# Altium PCB PCB1.PcbDoc
Units mm, origin at the board's own origin, x right, y up, seen from the top; angles counter-clockwise.
Board outline 70 x 100 mm, 2 copper layers (Top Layer, Bottom Layer), stack 1.601 mm thick; 10 components, 18 nets, 290 pads, 31 vias.
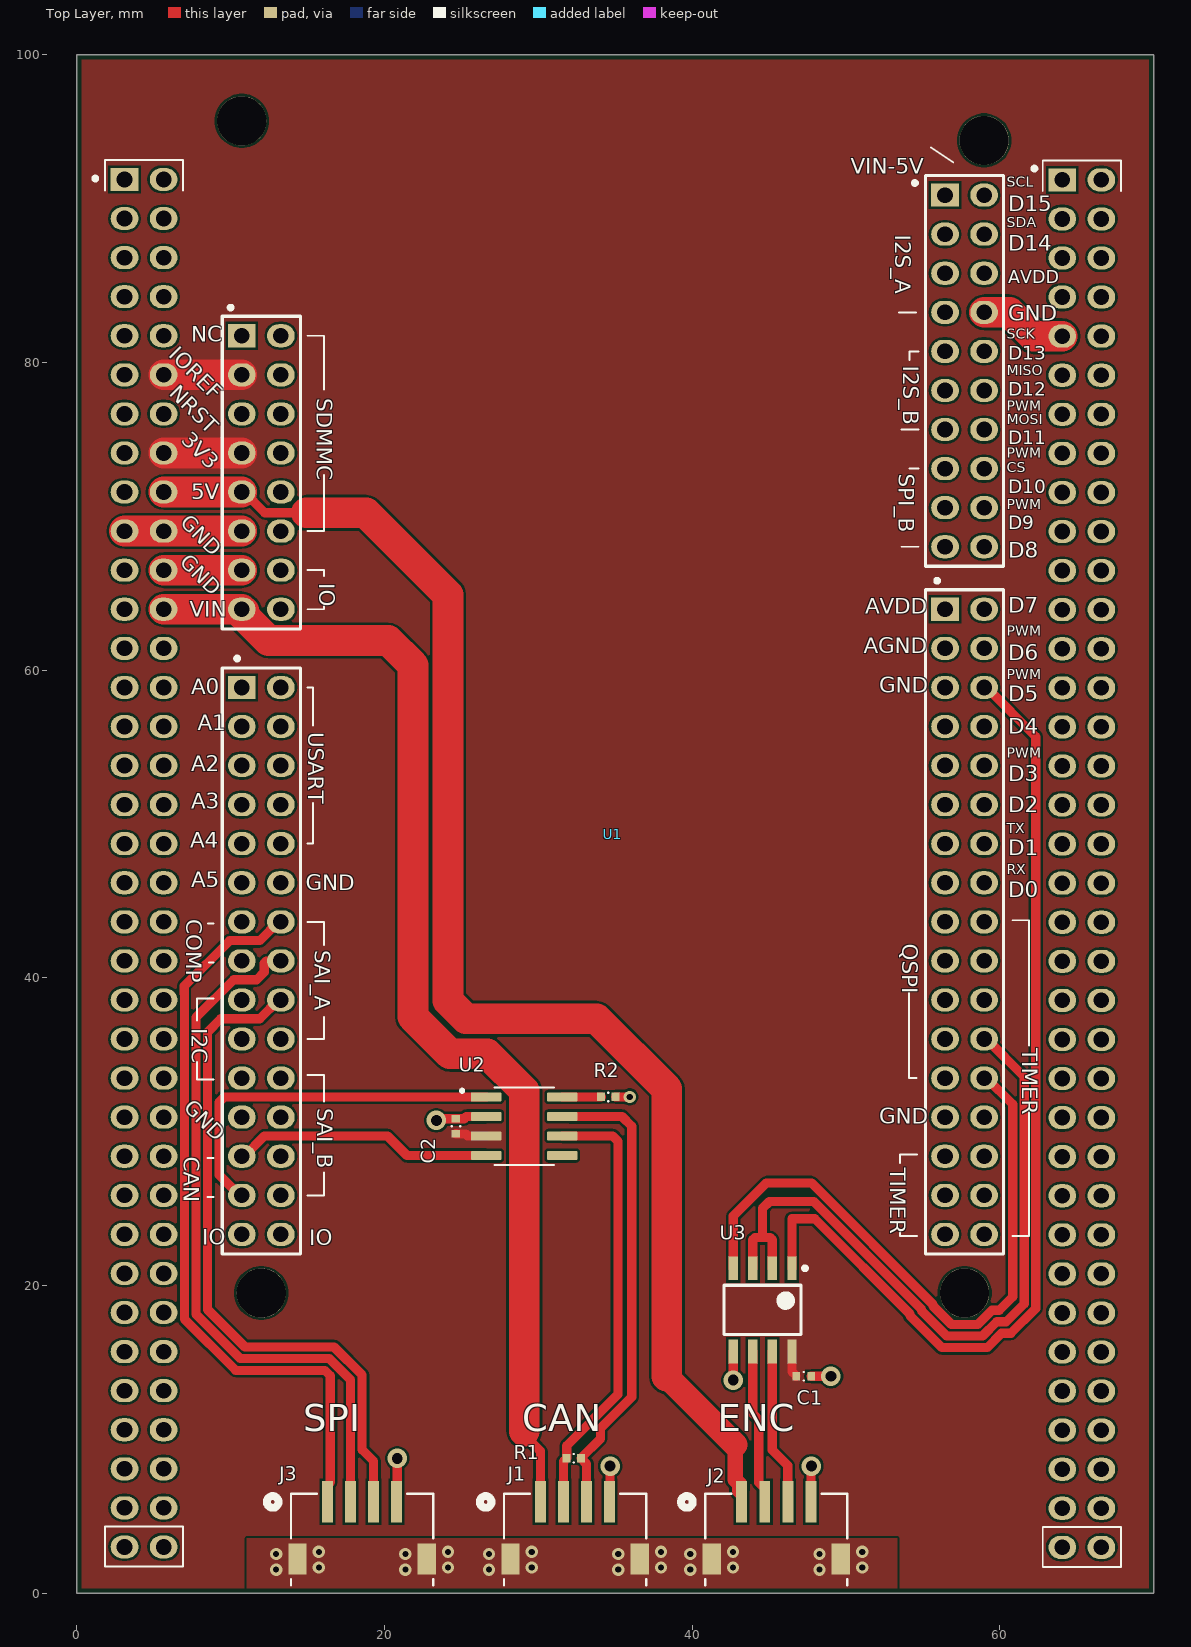
[diagram p0: Top Layer view]
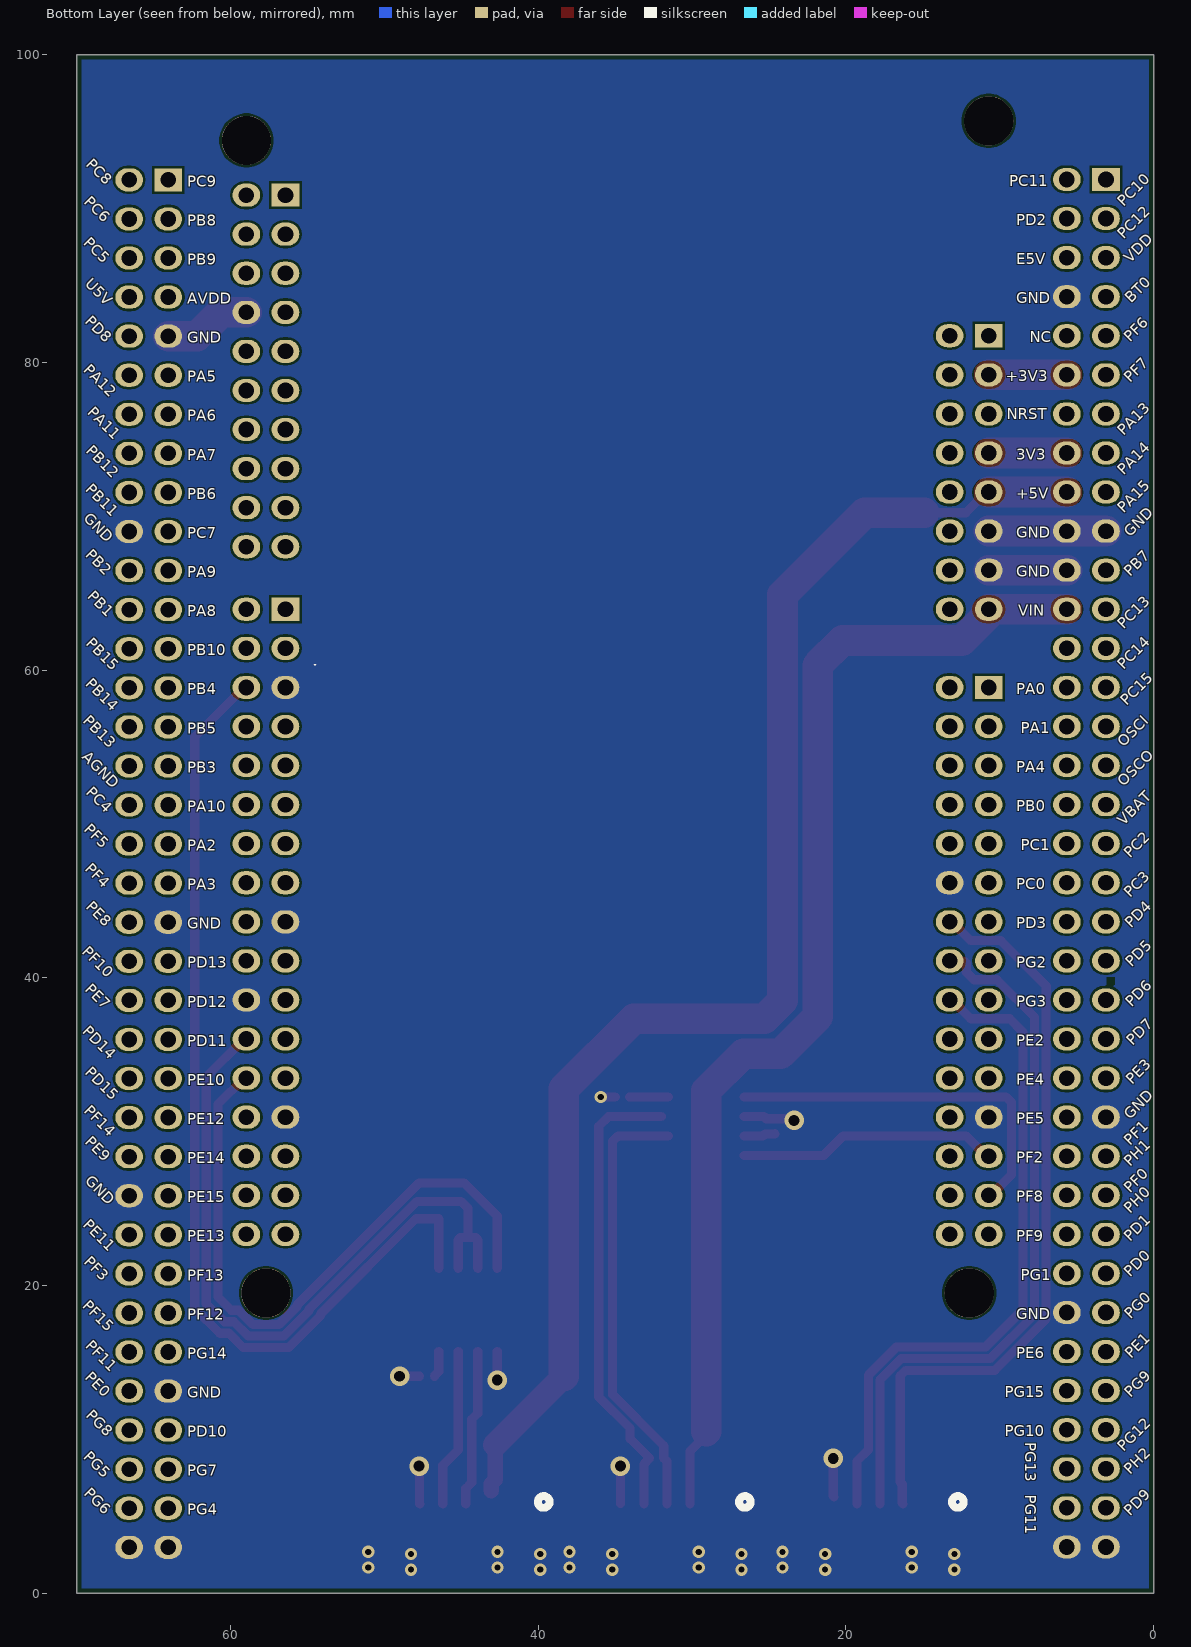
[diagram p1: Bottom Layer view, seen from below]
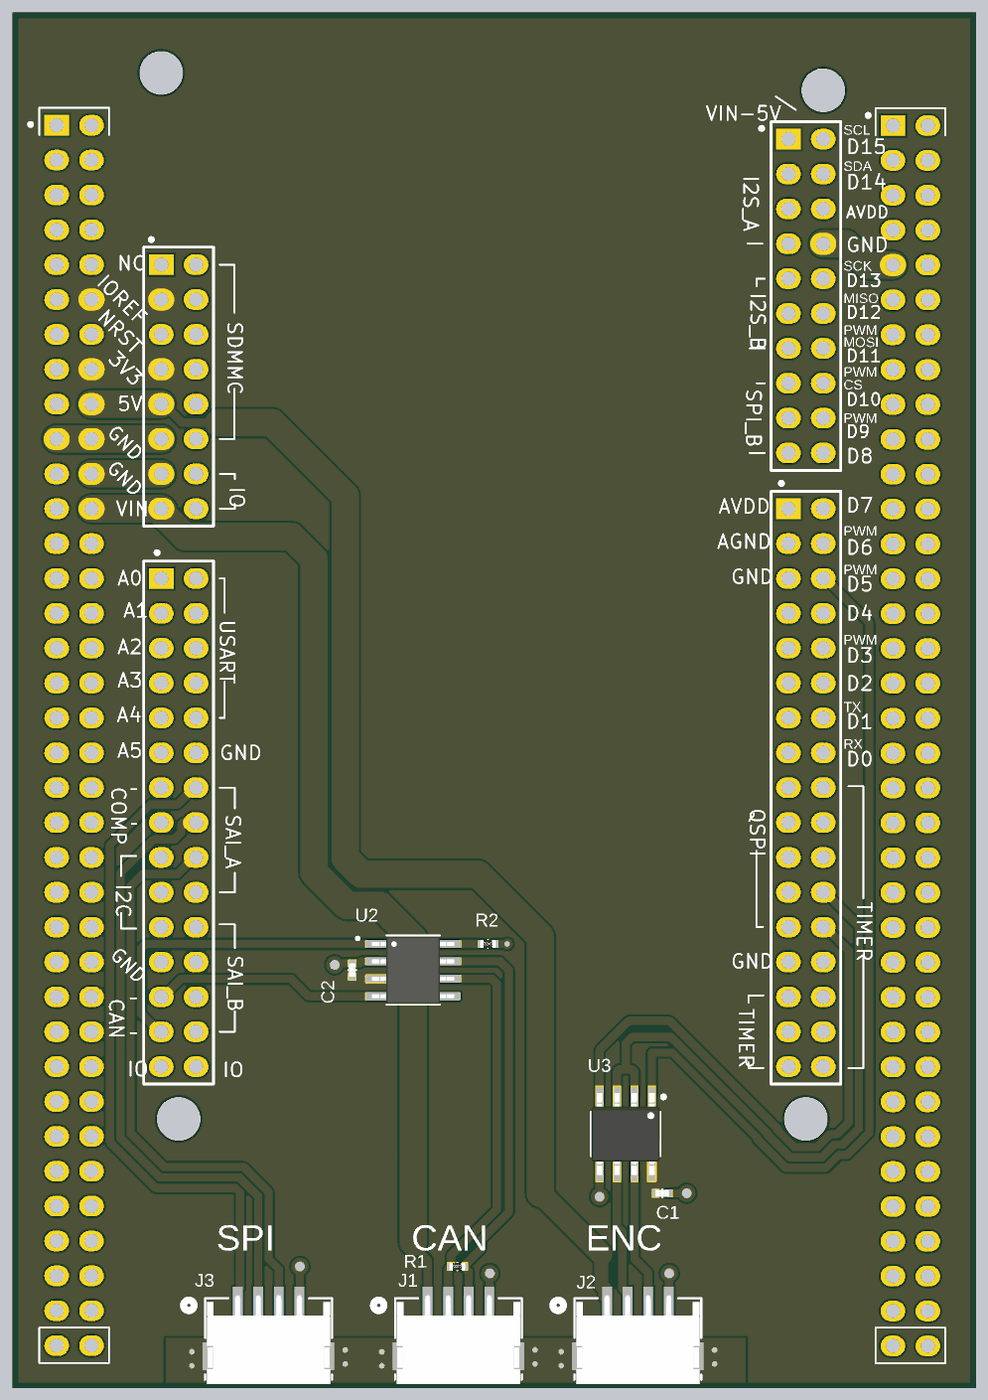
[diagram p2: 3D render of the assembled board from above, using the file's embedded part models]

## Layer stack, top to bottom
Top Solder: solder mask 0.0102, Solder Resist, Dk 3.5
Top Layer: signal copper 0.0356
Core: core 1.53, FR-4, Dk 4.5
Bottom Layer: signal copper 0.0356
Bottom Solder: solder mask 0.0102, Solder Resist, Dk 3.5

## Board outline
0,0 0,100 70,100 70,0

## Design rules (kind name [scope] priority, off if disabled: settings)
BoardOutlineClearance [All] p1: gap=0.3 ignorepadtopadclearanceinfootprint=FALSE except(0: Text-OutlineEdge) // Routed edge: JLCPCB 0.2 mm, PCBWay 0.25 mm. V-cut needs 0.4 mm
Clearance Clearance-ViaToPad [IsVia vs IsPad] p1: gap=0.2 ignorepadtopadclearanceinfootprint=FALSE // JLCPCB via-to-pad minimum 0.2 mm
Clearance [All] p2: gap=0.15 ignorepadtopadclearanceinfootprint=FALSE // JLCPCB/PCBWay 2-layer standard tier: 0.15 mm, above the 0.10 mm fab minimum and equal to JLCPCB SMD pad-to-pad
ComponentClearance [All] p1: gap=0.25 collisioncheckmode=3 verticalgap=0.254 showdistances=FALSE
DiffPairsRouting [All] p1: maxlimit=0.5 minlimit=0.15 mostfreqgap=0.2 toplayer_minwidth=0.15 toplayer_maxwidth=0.5 toplayer_prefwidth=0.25 bottomlayer_minwidth=0.15 bottomlayer_maxwidth=0.5 bottomlayer_prefwidth=0.25 maxuncoupledlength=12.7
FanoutControl Fanout_Default [All] p1: bgadir=Out bgaviamode=Centered fanoutstyle=Auto fanoutdirection=Alternating viagrid=0.025
HoleSize [All] p1: absolutevalues=TRUE maxlimit=6 minlimit=0.3 maxpercent=80.000 minpercent=20.000 // 0.3 mm keeps both fabs at base price; PCBWay max drill 6.0 mm
HoleToHoleClearance HoleToHoleClearance-Vias [IsVia vs IsVia] p1: gap=0.254 allowstackedmicrovias=TRUE // JLCPCB via hole-to-hole 0.2 mm
HoleToHoleClearance [All] p2: gap=0.5 allowstackedmicrovias=TRUE // JLCPCB pad hole-to-hole 0.45 mm, PCBWay 16 mil
MinimumAnnularRing [All] p1: minimumring=0.15 // PCBWay minimum 0.15 mm
MinimumSolderMaskSliver [All] p1: minsoldermaskwidth=0.1 // Green mask; black/white mask needs 0.13 mm at JLCPCB
PlaneConnect [All] p1: planeconnectstyle=Direct reliefexpansion=0.508 reliefentries=4 reliefconductorwidth=0.254 reliefairgap=0.254
PolygonConnect [All] p1: connectstyle=Direct reliefconductorwidth=0.3 reliefentries=4 polygonreliefangle="90 Angle" airgapwidth=0.25 // Pads: 0.3 mm spokes, vias direct
RoutingVias [All] p1: holewidth=0.3 width=0.6 viastyle="Through Hole" minholewidth=0.3 minwidth=0.6 maxholewidth=1 maxwidth=2 // 0.3 mm drill avoids the small-via surcharge; 0.15 mm ring meets PCBWay
SilkToSilkClearance [All] p1: silktosilkclearance=0.01
SilkToSolderMaskClearance [IsPad] p1: minsilkscreentomaskgap=0.1 clearancetoexposedcopper=TRUE
SolderMaskExpansion SolderMaskExpansion-Via [IsVia] p1: expansion=0 istentingtop=TRUE // Tented vias (free option at JLCPCB and PCBWay)
SolderMaskExpansion [All] p2: expansion=0.05 istentingtop=FALSE // 0.05 mm keeps dams between fine-pitch pads
SupplyNets "Schematic Supply Nets_3" [InNet('+VIN')] p1: voltage=0.000
SupplyNets "Schematic Supply Nets_2" [InNet('+5')] p2: voltage=0.000
SupplyNets "Schematic Supply Nets_1" [InNet('GND')] p3: voltage=0.000
SupplyNets "Schematic Supply Nets" [InNet('VCC')] p4: voltage=0.000
Width [All] p1: maxlimit=5 minlimit=0.15 preferedwidth=0.25 // JLCPCB/PCBWay 2-layer standard tier
17 further rules are at their usual default settings.

## Components (designator, comment, footprint, x,y, rotation, side; value= is the part's Value field where it differs from the comment)
C1 "100nF" CAPC1005X06N 47.244,14.097 r180 top
C2 "100nF" CAPC1005X06N 24.638,30.353 r270 top
J1 "S4B-ZR-SM4A-TF" CONN_S4B-ZR-SM4A-TF_JST 32.385,3.3 r180 top
J2 "S4B-ZR-SM4A-TF" CONN_S4B-ZR-SM4A-TF_JST 45.466,3.3 r180 top
J3 "S4B-ZR-SM4A-TF" CONN_S4B-ZR-SM4A-TF_JST 18.542,3.3 r180 top
R1 "100 Ohms" RESC1005X04N 32.303,8.763 r180 top
R2 "0 Ohms" RESC1005X04N 34.544,32.258 r180 top
U1 "nucleo-f767ZI" NUCLEO-144 3.1,3 r0 top locked
U2 "SN65HVD232DR" SOIC127P599X175-8N 29.083,30.353 r0 top
U3 "THVD1420DR" SOIC127P600X175-8N 44.577,18.415 r180 top

## Footprints (in the part's own frame and the unit in brackets; to place one, negate y for a bottom-side part, rotate by r counter-clockwise, add the part's x,y. Pads: shape width x height; smd on the part's side, far side on the other; paste and mask are expansions set on the pad)
CAPC1005X06N [mm] "Chip Capacitor 2-Leads, Body 1.00x0.50mm, IPC Medium Density"
  rect 0.475x0.55 smd: 1(-0.488,0) 2(0.488,0)
  silkscreen extent 0,-0.28 0,0.28, body extent -0.5,-0.27 0.5,0.27, height 0.36
CONN_S4B-ZR-SM4A-TF_JST [mil]
  rect 28x106 smd paste+0 mask+0: 1(88.5,-103.44) 2(29.5,-103.44) 3(-29.5,-103.44) 4(-88.5,-103.44)
  rect 47x79 smd paste+0 mask+0: MP(-165.35,42.23) MP(165.35,42.23)
  silkscreen extent -182,-124 244,110, body extent -177,-133 177,123, height 146
NUCLEO-144 [mm]
  round 3.2 hole 3.2 unplated: 0(7.62,92.71) 0(8.89,16.51) 0(54.61,16.51) 0(55.88,91.44)
  oval 1.8x1.5 hole 1.02: 1(0,0) 1(0,27.94) 1(0,66.04) 1(2.54,0) 1(2.54,15.24) 1(2.54,63.5) 1(2.54,66.04) 1(2.54,81.28) 1(7.62,27.94) 1(7.62,63.5) 1(7.62,66.04) 1(10.16,43.18) 1(53.34,27.94) 1(53.34,40.64) 1(53.34,55.88) 1(55.88,35.56) 1(55.88,80.264) 1(60.96,-0.025) 1(60.96,10.135) 1(60.96,40.615) 1(60.96,78.715) 1(63.5,-0.025) 1(63.5,22.835) 1(63.5,66.015) 3(10.16,73.66) 4(2.54,45.72) 4(2.54,88.9) 4(10.16,71.12) 5(0,86.36) 5(10.16,68.58) 6(2.54,86.36) 6(10.16,66.04) 7(0,83.82) 8(2.54,83.82) 9(0,81.28) 10(0,78.74) 11(2.54,78.74) 13(10.16,78.74) 13(63.5,88.875) 14(0,76.2) 14(10.16,25.4) 15(2.54,76.2) 15(7.62,76.2) 16(0,73.66) 17(2.54,73.66) 17(7.62,73.66) 18(0,71.12) 19(2.54,71.12) 19(7.62,71.12) 20(0,68.58) 20(53.34,77.724) 21(2.54,68.58) 21(7.62,68.58) 22(0,63.5) 22(10.16,76.2) 23(0,60.96) 24(2.54,60.96) 24(7.62,60.96) 25(0,58.42) 26(2.54,58.42) 27(0,55.88) 29(0,53.34) 29(7.62,30.48) 30(2.54,53.34) 31(0,50.8) 31(7.62,33.02) 32(2.54,50.8) 32(53.34,67.564) 33(0,48.26) 34(2.54,48.26) 34(53.34,22.86) 35(0,45.72) 35(53.34,50.8) 37(0,43.18) 37(7.62,50.8) 38(2.54,43.18) 38(7.62,53.34) 39(0,40.64) 39(10.16,48.26) 40(2.54,40.64) 40(10.16,45.72) 41(0,38.1) 41(10.16,50.8) 42(2.54,38.1) 42(10.16,63.5) 43(0,35.56) 43(10.16,53.34) 44(2.54,35.56) 44(10.16,60.96) 45(0,33.02) 45(10.16,55.88) 46(2.54,33.02) 46(10.16,40.64) 46(53.34,30.48) 47(0,30.48) 47(10.16,30.48) 48(2.54,30.48) 48(10.16,38.1) 49(2.54,27.94) 49(10.16,35.56) 50(0,25.4) 52(0,22.86) 53(2.54,22.86) 53(10.16,27.94) 54(0,20.32) 54(7.62,22.86) 55(2.54,20.32) 55(10.16,22.86) 56(0,17.78) 56(7.62,25.4) 57(2.54,17.78) 57(10.16,20.32) 58(0,15.24) 58(7.62,20.32) 59(0,12.7) 60(2.54,12.7) 60(10.16,33.02) 62(2.54,10.16) 63(0,7.62) 64(2.54,7.62) 65(0,5.08) 66(2.54,5.08) 67(0,2.54) 68(2.54,2.54) 69(60.96,43.155) 70(7.62,48.26) 70(63.5,17.755) 71(7.62,45.72) 71(63.5,45.695) 73(7.62,40.64) 74(7.62,38.1) 74(55.88,72.644) 75(2.54,25.4) 75(7.62,35.56) 80(55.88,87.884) 80(60.96,86.335) 81(63.5,86.335) 82(55.88,85.344) 82(60.96,83.795) 83(63.5,83.795) 84(55.88,82.804) 84(60.96,81.255) 85(63.5,81.255) 86(63.5,78.715) 87(55.88,77.724) 87(60.96,76.175) 88(63.5,76.175) 89(55.88,75.184) 89(60.96,73.635) 90(63.5,73.635) 91(60.96,71.095) 92(53.34,80.264) 92(63.5,71.095) 93(53.34,45.72) 93(60.96,68.555) 94(55.88,20.32) 94(63.5,68.555) 95(53.34,75.184) 95(60.96,66.015) 96(60.96,63.475) 97(53.34,43.18) 97(63.5,63.475) 98(60.96,60.935) 99(53.34,53.34) 99(63.5,60.935) 100(55.88,22.86) 100(60.96,58.395) 101(53.34,85.344) 101(63.5,58.395) 102(53.34,65.024) 102(60.96,55.855) 103(63.5,55.855) 104(53.34,72.644) 104(60.96,53.315) 105(53.34,82.804) 105(63.5,53.315) 106(53.34,70.104) 106(60.96,50.775) 107(53.34,58.42) 107(63.5,50.775) 108(60.96,48.235) 109(63.5,48.235) 110(60.96,45.695) 112(53.34,48.26) 112(63.5,43.155) 113(55.88,40.64) 113(63.5,40.615) 115(7.62,43.18) 115(63.5,38.075) 116(53.34,35.56) 116(60.96,35.535) 117(55.88,38.1) 117(63.5,35.535) 119(55.88,70.104) 119(63.5,32.995) 120(55.88,33.02) 120(60.96,30.455) 121(55.88,67.564) 121(63.5,30.455) 122(55.88,30.48) 122(60.96,27.915) 123(55.88,53.34) 123(63.5,27.915) 124(55.88,27.94) 124(60.96,25.375) 125(55.88,58.42) 125(63.5,25.375) 126(55.88,25.4) 126(60.96,22.835) 127(55.88,50.8) 127(60.96,20.295) 128(55.88,55.88) 128(63.5,20.295) 129(55.88,60.96) 129(60.96,17.755) 131(55.88,65.024) 131(60.96,15.215) 132(55.88,48.26) 132(63.5,15.215) 134(63.5,12.675) 135(53.34,20.32) 135(63.5,10.135) 136(60.96,7.595) 137(63.5,7.595) 138(60.96,5.055) 139(63.5,5.055) 140(60.96,2.515) 141(63.5,2.515) 144(55.88,45.72) 144(60.96,12.675) 145(0,10.16) 145(55.88,43.18) 146(53.34,38.1) 146(60.96,38.075) 148(53.34,33.02) 148(60.96,32.995) 149(2.54,55.88) 149(53.34,25.4)
  rect 1.8x1.5 hole 1.02: 3(0,88.9) 12(7.62,78.74) 69(7.62,55.88) 78(60.96,88.875) 81(53.34,87.884) 84(53.34,60.96)
  Bottom Layer pour cut-out: -0.567,37.033 -0.567,36.555 -0.051,36.555 -0.051,37.041
  silkscreen extent -2.03,-1.3 64.77,90.98, body extent -1.27,-1.3 64.77,90.17, height 9
RESC1005X04N [mm] "Chip Resistor, 2-Leads, Body 1.00x0.50mm, IPC Medium Density"
  rect 0.525x0.55 smd: 1(-0.463,0) 2(0.463,0)
  silkscreen extent 0,-0.28 0,0.28, body extent -0.58,-0.28 0.58,0.28, height 0.41
SOIC127P599X175-8N [mm]
  rrect25% 1.97x0.6 smd: 1(-2.47,1.905) 2(-2.47,0.635) 3(-2.47,-0.635) 4(-2.47,-1.905) 5(2.47,-1.905) 6(2.47,-0.635) 7(2.47,0.635) 8(2.47,1.905)
  silkscreen extent -4.14,-2.52 1.95,2.52, body extent -3,-2.45 3,2.45, height 1.75
SOIC127P600X175-8N [mm] "SOIC, 8-Leads, Body 4.90x3.90mm, Pitch 1.27mm, IPC Medium Density"
  rect 0.6x1.55 smd paste-0.05: 1(-1.905,-2.7) 2(-0.635,-2.7) 3(0.635,-2.7) 4(1.905,-2.7) 5(1.905,2.7) 6(0.635,2.7) 7(-0.635,2.7) 8(-1.905,2.7)
  silkscreen extent -2.88,-2.82 2.5,1.6, body extent -2.5,-3 2.5,3, height 1.75

## Part data
C1 C2: library part CGA2B1X7R1C104K050BC, "CAP CER 0.1UF 16V X7R 0402", Capacitance="0.1 µF", Case Code (Imperial)=0402, Manufacturer 1="TDK Corporation", Supplier Part Number 1=445-5613-1-ND, Temperature Coefficient=X7R, Tolerance=±10%, Voltage Rating=16V, AEC-Q200=True, Manufacturer Part Number 1=CGA2B1X7R1C104K050BC, Mounting Type="Surface Mount, MLCC", Part Name=CGA2B1X7R1C104K050BC, Supplier 1=Digi-Key
J1 J2 J3: "CONN HEADER SMD R/A 4POS 1.5MM", Manufacturer 1="JST Sales America Inc.", Supplier Part Number 1=455-S4B-ZR-SM4A-TFTR-ND, Manufacturer Part Number 1=S4B-ZR-SM4A-TF, Part Name=S4B-ZR-SM4A-TF, Supplier 1=Digi-Key
R1: library part ERJ-2RKF1000X, "RES SMD 100 OHM 1% 1/10W 0402", Case Code (Imperial)=0402, Manufacturer 1="Panasonic Industry", Power (Watts)="0.1W, 1/10W", Supplier Part Number 1=P100LTR-ND, Tolerance=±1%, AEC-Q200=False, Manufacturer Part Number 1=ERJ-2RKF1000X, Part Name=ERJ-2RKF1000X, Resistance="100 Ohms", Supplier 1=Digi-Key
R2: library part ERJ-2GE0R00X, "RES SMD 0 OHM JUMPER 1/10W 0402", Case Code (Imperial)=0402, Manufacturer 1="Panasonic Industry", Power (Watts)=-, Supplier Part Number 1=P0.0JTR-ND, Tolerance=Jumper, AEC-Q200=False, Manufacturer Part Number 1=ERJ-2GE0R00X, Part Name=ERJ-2GE0R00X, Resistance="0 Ohms", Supplier 1=Digi-Key
U1: library part NUCLEO-144
U2: "IC TRANSCEIVER HALF 1/1 8SOIC", Manufacturer 1="Texas Instruments", Package="SOIC-8 Texas Instruments", Package / Case="8-SOIC (0.154\", 3.90mm Width)", Supplier Device Package=8-SOIC, Supplier Part Number 1=296-26344-1-ND, AEC-Q200=False, Check_prices=https://www.snapeda.com/parts/SN65HVD232DR/Texas+Instruments/view-part/?ref=eda, Function=-, Manufacturer Part Number 1=SN65HVD232DR, MF="Texas Instruments", MP=SN65HVD232DR, Part Name=SN65HVD232DR, SnapEDA_Link=https://www.snapeda.com/parts/SN65HVD232DR/Texas+Instruments/view-part/?ref=snap, Supplier 1=Digi-Key
U3: "IC TRANSCEIVER HALF 1/1 8SOIC", Manufacturer 1="Texas Instruments", Package / Case="8-SOIC (0.154\", 3.90mm Width)", Supplier Device Package=8-SOIC, Supplier Part Number 1=296-THVD1420DRTR-ND, AEC-Q200=False, Function=-, Manufacturer Part Number 1=THVD1420DR, Part Name=THVD1420DR, Supplier 1=Digi-Key

## Via types
v1: diameter 0.8, hole 0.4, Top Layer to Bottom Layer, tented both sides, 25 vias
v2: diameter 1.27, hole 0.711, Top Layer to Bottom Layer, tented both sides, 6 vias

## Nets (pads, with @x,y where several pads share a name; then routed paths per layer and width w, separated by ;. In a path a pad name is that pad's centre, name@x,y a point inside that pad or via, vN(x,y) a via of type N, cw(c..) or ccw(c..) an arc to the next point about the centre after c; other vN are vias at no path point)
+5: J2.1 U1.21 | length 91.3
  Top Layer w0.6: U1.21@10.72,71.58 10.87,71.58 12.21,70.24 13.907,70.24
  Top Layer w1: 42.799,9.652 42.799,7.379 43.074,7.104 J2.1@43.074,6.649
  Top Layer w1.6: 38.354,14.097 42.799,9.652
  Top Layer w2: U1.21@5.64,71.58 U1.21@10.72,71.58 ; 14.906,70.231 18.796,70.231 24.13,64.897 24.13,38.51 25.302,37.338 33.782,37.338 38.354,32.766 38.354,14.097
+VIN: J1.1 U1.24 | length 77.2
  Top Layer w0.6: 28.956,10.414 30.137,9.233 J1.1@30.137,5.802
  Top Layer w2: U1.24@5.64,63.96 10.72,63.96 10.87,63.81 10.87,63.513 12.452,61.93 20.239,61.93 21.844,60.325 21.844,37.465 24.249,35.06 26.678,35.06 29.083,32.655 29.083,10.541
CAN1_RX: U1.56 U2.4 | length 17
  Top Layer w0.6: U1.56@10.72,28.4 10.87,28.4 12.188,29.718 20.193,29.718 21.463,28.448 U2.4
CAN1_TX: U1.54 U2.1 | length 24.3
  Top Layer w0.6: U1.54@10.72,25.86 10.57,25.86 9.24,27.19 9.24,31.907 9.591,32.258 U2.1
GND: C1.1 C2.1 J1.4 J1.MP J2.4 J2.MP J3.4 J3.MP R2.1 U1.1 U2.2 U3.5 | length 33.3
  Top Layer w0.254: J1.4@34.652,5.825 J1.4@34.654,5.823 ; v2@34.652,8.236 v2(34.671,8.255)
  Top Layer w0.6: J3.4@20.78,6.26 20.828,6.308 v2(20.828,8.763) ; v2(23.368,30.734) 23.475,30.841 25.184,30.841 25.331,30.988 U2.2 ; J1.4@34.652,5.825 v2@34.652,8.236 ; R2.1 v1(35.941,32.258) ; v2(42.672,13.843) U3.5 ; J2.4@47.714,5.802 47.733,5.821 47.733,8.236 v2(47.752,8.255) ; C1.1 v2(49.022,14.097)
  Top Layer w2: U1.1@3.1,69.04 U1.1@10.72,69.04 ; U1.1@5.64,66.5 U1.1@10.72,66.5 ; U1.1@58.98,83.264 60.627,83.264 62.176,81.715 U1.1@64.06,81.715
  other v1: 12.954,1.524 21.354,1.524 26.797,1.524 35.197,1.524 39.878,1.524 48.278,1.524 15.73,1.665 24.13,1.665 29.573,1.665 37.973,1.665 42.654,1.665 51.054,1.665 12.954,2.54 21.354,2.54 26.797,2.54 35.197,2.54 39.878,2.54 48.278,2.54 15.73,2.681 24.13,2.681 29.573,2.681 37.973,2.681 42.654,2.681 51.054,2.681
NetJ1_2: J1.2 R1.2 U2.6 | length 28.8
  Top Layer w0.6: U2.6 34.828,29.718 35.179,29.367 35.179,12.918 31.841,9.58 R1.2 31.636,8.558 J1.2@31.636,5.802
NetJ1_3: J1.3 R1.1 U2.7 | length 30.4
  Top Layer w0.6: U2.7@32.004,30.988 35.433,30.988 36.068,30.353 36.068,12.747 34.036,10.715 34.036,10.033 R1.1 33.134,8.395 J1.3@33.134,5.802
NetR2_2: R2.2 U2.8 | length 2.5
  Top Layer w0.6: U2.8 R2.2
ODRV_MISO: J3.3 U1.49 | length 44.3
  Top Layer w0.6: U1.49@5.64,30.94 U1.49@5.763,30.94 ; U1.49@13.26,38.56 13.11,38.56 11.888,37.338 9.356,37.338 8.49,36.472 8.49,18.439 10.927,16.002 16.718,16.002 18.543,14.177 18.543,9.316 19.291,8.567 J3.3@19.291,5.802
ODRV_MOSI: U1.60
ODRV_NSS: J3.2 U1.48 | length 46.6
  Top Layer w0.6: U1.48@13.26,41.1 12.331,41.1 12.182,40.951 12.182,40.376 11.684,39.878 10.191,39.878 7.74,37.427 7.74,18.128 10.616,15.252 16.407,15.252 17.793,13.867 J3.2@17.793,5.802
ODRV_SCK: J3.1 U1.46 | length 49.1
  Top Layer w0.6: U1.46@13.26,43.64 13.11,43.64 11.888,42.418 9.932,42.418 6.985,39.471 6.985,38.974 6.99,38.969 6.99,17.818 10.33,14.478 16.121,14.478 16.472,14.127 16.472,7.2 16.35,7.077 16.35,5.858 J3.1@16.294,5.802
RS485_A: J2.2 U3.6 | length 10.2
  Top Layer w0.6: U3.6 43.942,11.684 44.323,11.303 44.323,7.187 44.717,6.793 J2.2@44.717,5.802
RS485_B: J2.3 U3.7 | length 10.3
  Top Layer w0.6: U3.7 45.212,9.3 46.215,8.297 J2.3@46.215,5.802
VCC: C1.2 C2.2 U1.15 U1.19 U2.3 U3.8 | length 13.9
  Top Layer w0.6: C2.2 24.658,29.845 25.273,29.845 25.4,29.718 U2.3 ; U3.8 46.482,14.409 46.756,14.135 C1.2
  Top Layer w2: U1.19@5.64,74.12 U1.19@10.72,74.12 ; U1.15@5.64,79.2 U1.15@10.72,79.2
YASK_DE: U1.120 U3.2 U3.3 | length 47.1
  Top Layer w0.6: U3.3 43.942,22.965 44.091,23.114 44.577,23.114 ; U3.2 45.212,22.965 45.063,23.114 44.577,23.114 ; U1.120@58.98,36.02 59.13,36.02 61.583,33.567 61.583,18.817 60.407,17.641 59.801,17.641 58.87,16.71 56.55,16.71 54.91,18.35 54.91,18.451 47.898,25.463 45.021,25.463 44.577,25.019 44.577,23.114
YASK_RX: U1.128 U3.1 | length 65.5
  Top Layer w0.6: U3.1 46.482,24.339 47.961,24.339 54.16,18.141 54.16,18.04 56.24,15.96 59.18,15.96 60.111,16.891 60.72,16.891 62.333,18.504 62.333,55.677 59.13,58.88 U1.128@58.98,58.88
YASK_TX: U1.122 U3.4 | length 42.1
  Top Layer w0.6: U3.4 42.672,24.511 44.819,26.658 47.764,26.658 55.66,18.762 55.66,18.661 56.861,17.46 58.559,17.46 59.49,18.391 59.958,18.391 60.833,19.266 60.833,31.777 59.13,33.48 U1.122@58.98,33.48
pads on no net: U1.0 U1.3 U1.4 U1.5 U1.6 U1.7 U1.8 U1.9 U1.10 U1.11 U1.12 U1.13 U1.14 U1.16 U1.17 U1.18 U1.20 U1.22 U1.23 U1.25 U1.26 U1.27 U1.29 U1.30 U1.31 U1.32 U1.33 U1.34 U1.35 U1.37 U1.38 U1.39 U1.40 U1.41 U1.42 U1.43 U1.44 U1.45 U1.47 U1.50 U1.52 U1.53 U1.55 U1.57 U1.58 U1.59 U1.62 U1.63 U1.64 U1.65 U1.66 U1.67 U1.68 U1.69 U1.70 U1.71 U1.73 U1.74 U1.75 U1.78 U1.80 U1.81 U1.82 U1.83 U1.84 U1.85 U1.86 U1.87 U1.88 U1.89 U1.90 U1.91 U1.92 U1.93 U1.94 U1.95 U1.96 U1.97 U1.98 U1.99 U1.100 U1.101 U1.102 U1.103 U1.104 U1.105 U1.106 U1.107 U1.108 U1.109 U1.110 U1.112 U1.113 U1.115 U1.116 U1.117 U1.119 U1.121 U1.123 U1.124 U1.125 U1.126 U1.127 U1.129 U1.131 U1.132 U1.134 U1.135 U1.136 U1.137 U1.138 U1.139 U1.140 U1.141 U1.144 U1.145 U1.146 U1.148 U1.149 U2.5

## Polygon pours and split planes (outlines as drawn)
VCC on Top Layer "NONET_L-01_P-001" (solid, pour order 2): -3.556,0.254 -3.302,0 70.866,0 70.866,100.076 70.612,100.33 70.358,100.076 -3.556,100.076
GND on Top Layer "NONET_L-01_P-001" (solid, pour order 1): 11.049,-0.89 11.049,3.556 53.34,3.556 53.34,-0.89
GND on Bottom Layer "NONET_L-01_P-001" (solid, pour order 0): -3.145,0.127 70.104,0.127 70.104,99.949 69.977,100.076 -3.399,100.076

## Silkscreen, mask and mechanical layers (free items; w line width, h text height)
Top Overlay:
  text "SPI" at 14.732,9.938 h3
  text "CAN" at 28.956,9.938 h3
  text "ENC" at 41.656,9.938 h3
Board Shape:
  the board outline again, w0.254

## Text inside footprints (layer, text, board x,y; h text height)
U1: Top Overlay "TIMER" at 52.871,27.638 h1.02 r270; Top Overlay "QSPI" at 53.671,42.218 h1.02 r270; Top Overlay "GND" at 6.885,31.473 h0.97 r315; Top Overlay "NC" at 7.438,81.359 h1.02; Top Overlay "PWM" at 60.453,76.635 h1.14; Top Overlay "PWM" at 60.453,73.587 h1.14; Top Overlay "D0" at 60.555,45.24 h1.02; Top Overlay "D1" at 60.555,47.983 h1.02; Top Overlay "GND" at 52.163,30.508 h1.02; Top Overlay "CS" at 60.453,72.647 h1.14; Top Overlay "MOSI" at 60.453,75.746 h1.14; Top Overlay "MISO" at 60.453,78.946 h1.14; Top Overlay "SCK" at 60.453,81.308 h1.14; Top Overlay "SDA" at 60.455,88.573 h1.14; Top Overlay "SCL" at 60.455,91.214 h1.14; Top Overlay "PWM" at 60.455,54.079 h1.14; Top Overlay "PWM" at 60.455,59.185 h1.14; Top Overlay "PWM" at 60.455,62 h1.14; Top Overlay "PWM" at 60.453,70.234 h1.14; Top Overlay "TIMER" at 61.469,35.41 h1.02 r270; Top Overlay "SPI_B" at 53.417,72.774 h1.02 r270; Top Overlay "I2S_A" at 53.214,88.319 h1.02 r270; Top Overlay "COMP" at 7.113,43.792 h1.02 r270; Top Overlay "I2C" at 7.469,36.731 h1.02 r270; Top Overlay "CAN" at 6.961,28.375 h1.02 r270; Top Overlay "SAI_B" at 15.622,31.524 h1.02 r270; Top Overlay "SAI_A" at 15.47,41.786 h1.02 r270; Top Overlay "USART" at 15.038,55.959 h1.02 r270; Top Overlay "IO" at 15.749,65.636 h1.02 r270; Top Overlay "SDMMC" at 15.597,77.676 h1.02 r270; Top Overlay "GND" at 6.638,66.938 h0.97 r315; Top Overlay "VIN" at 7.327,63.477 h1.02; Top Overlay "5V" at 7.443,71.123 h1.02; Top Overlay "3V3" at 6.732,74.882 h1.02 r315; Top Overlay "NRST" at 5.945,77.93 h1.02 r315; Top Overlay "GND" at 6.663,69.526 h0.97 r315; Top Overlay "IOREF" at 5.919,80.445 h1.02 r315; Top Overlay "D8" at 60.555,67.313 h1.02; Top Overlay "D9" at 60.555,69.167 h0.89; Top Overlay "D10" at 60.555,71.504 h0.89; Top Overlay "D11" at 60.555,74.679 h0.89; Top Overlay "D12" at 60.555,77.854 h0.89; Top Overlay "D13" at 60.555,80.165 h0.89; Top Overlay "GND" at 60.555,82.705 h1.02; Top Overlay "AVDD" at 60.555,85.169 h0.84; Top Overlay "D14" at 60.555,87.277 h1.02; Top Overlay "D15" at 60.555,89.843 h1.02; Top Overlay "D5" at 60.555,57.991 h1.02; Top Overlay "D4" at 60.555,55.857 h1.02; Top Overlay "D3" at 60.555,52.784 h1.02; Top Overlay "D2" at 60.555,50.752 h1.02; Top Overlay "TX" at 60.455,49.177 h1.14; Top Overlay "RX" at 60.455,46.491 h1.14; Top Overlay "D6" at 60.555,60.658 h1.02; Top Overlay "D7" at 60.555,63.731 h1.02; Top Overlay "A5" at 7.434,45.875 h1.02; Top Overlay "A4" at 7.385,48.466 h1.02; Top Overlay "A3" at 7.434,50.981 h1.02; Top Overlay "A2" at 7.434,53.419 h1.02; Top Overlay "A1" at 7.869,56.086 h1.02; Top Overlay "A0" at 7.434,58.423 h1.02; Top Overlay "VIN-5V" at 50.319,92.281 h1.02; Top Overlay "I2S_B" at 53.722,79.784 h1.02 r270; Top Overlay "IO" at 15.114,22.609 h1.02; Top Overlay "IO" at 8.16,22.66 h1.02; Top Overlay "GND" at 14.886,45.697 h1.02; Top Overlay "GND" at 52.163,58.524 h1.02; Top Overlay "AGND" at 51.152,61.09 h1.02; Top Overlay "AVDD" at 51.258,63.655 h1.02; Bottom Overlay "NC" at 8.054,81.308 h0.71; Bottom Overlay "PA12" at 69.623,79.454 h0.71 r45; Bottom Overlay "PC11" at 9.387,91.468 h0.71; Bottom Overlay "PD2" at 8.942,88.928 h0.71; Bottom Overlay "E5V" at 8.942,86.388 h0.71; Bottom Overlay "GND" at 8.942,83.848 h0.71; Bottom Overlay "+3V3" at 9.602,78.768 h0.71; Bottom Overlay "NRST" at 9.552,76.304 h0.71; Bottom Overlay "3V3" at 8.942,73.688 h0.71; Bottom Overlay "+5V" at 8.942,71.148 h0.71; Bottom Overlay "GND" at 8.942,68.608 h0.71; Bottom Overlay "GND" at 8.942,66.068 h0.71; Bottom Overlay "PB0" at 8.942,50.828 h0.71; Bottom Overlay "PA4" at 8.942,53.368 h0.71; Bottom Overlay "PA1" at 8.646,55.908 h0.71; Bottom Overlay "PA0" at 8.942,58.448 h0.71; Bottom Overlay "VIN" at 8.794,63.528 h0.71; Bottom Overlay "PE2" at 8.942,35.588 h0.71; Bottom Overlay "PG3" at 8.942,38.128 h0.71; Bottom Overlay "PG2" at 8.942,40.668 h0.71; Bottom Overlay "PD3" at 8.942,43.208 h0.71; Bottom Overlay "PC0" at 8.942,45.748 h0.71; Bottom Overlay "PC1" at 8.646,48.288 h0.71; Bottom Overlay "PG1" at 8.646,20.348 h0.71; Bottom Overlay "PF9" at 8.942,22.888 h0.71; Bottom Overlay "PF8" at 8.942,25.428 h0.71; Bottom Overlay "PF2" at 8.942,27.968 h0.71; Bottom Overlay "PE4" at 8.942,33.048 h0.71; Bottom Overlay "PG11" at 8.358,6.404 h0.71 r90; Bottom Overlay "PG13" at 8.332,9.807 h0.71 r90; Bottom Overlay "PG10" at 9.683,10.188 h0.71; Bottom Overlay "PG15" at 9.683,12.728 h0.71; Bottom Overlay "PE6" at 8.942,15.268 h0.71; Bottom Overlay "GND" at 8.942,17.808 h0.71; Bottom Overlay "PE5" at 8.942,30.508 h0.71; Bottom Overlay "PD9" at 1.525,4.956 h0.71 r315; Bottom Overlay "PH2" at 1.525,7.674 h0.71 r315; Bottom Overlay "PG12" at 1.932,9.172 h0.71 r315; Bottom Overlay "PG9" at 1.474,12.652 h0.71 r315; Bottom Overlay "PE1" at 1.449,15.217 h0.71 r315; Bottom Overlay "PF1" at 1.525,29.035 h0.71 r315; Bottom Overlay "PF0" at 1.525,25.962 h0.71 r315; Bottom Overlay "PD1" at 1.525,22.812 h0.71 r315; Bottom Overlay "PD0" at 1.525,20.501 h0.71 r315; Bottom Overlay "PG0" at 1.474,17.783 h0.71 r315; Bottom Overlay "PD5" at 1.424,40.668 h0.71 r315; Bottom Overlay "PD6" at 1.424,38.052 h0.71 r315; Bottom Overlay "PD7" at 1.373,35.537 h0.71 r315; Bottom Overlay "PE3" at 1.398,33.023 h0.71 r315; Bottom Overlay "GND" at 1.525,30.737 h0.71 r315; Bottom Overlay "OSCO" at 1.932,52.403 h0.71 r315; Bottom Overlay "VBAT" at 1.932,49.838 h0.71 r315; Bottom Overlay "PC2" at 1.525,47.755 h0.71 r315; Bottom Overlay "PC3" at 1.525,45.164 h0.71 r315; Bottom Overlay "PD4" at 1.449,43.183 h0.71 r315; Bottom Overlay "PB7" at 1.525,66.043 h0.71 r315; Bottom Overlay "PC13" at 1.932,62.614 h0.71 r315; Bottom Overlay "PC14" at 1.932,59.998 h0.71 r315; Bottom Overlay "PC15" at 1.754,57.661 h0.71 r315; Bottom Overlay "PF7" at 1.525,78.641 h0.71 r315; Bottom Overlay "PA13" at 1.932,75.212 h0.71 r315; Bottom Overlay "PA14" at 1.932,72.647 h0.71 r315; Bottom Overlay "PA15" at 1.932,70.158 h0.71 r315; Bottom Overlay "GND" at 1.525,68.608 h0.71 r315; Bottom Overlay "PC10" at 1.932,90.097 h0.71 r315; Bottom Overlay "PC12" at 1.932,87.988 h0.71 r315; Bottom Overlay "VDD" at 1.525,86.414 h0.71 r315; Bottom Overlay "BT0" at 1.449,83.823 h0.71 r315; Bottom Overlay "PF6" at 1.525,81.283 h0.71 r315; Bottom Overlay "GND" at 62.815,81.283 h0.71; Bottom Overlay "AVDD" at 62.815,83.823 h0.71; Bottom Overlay "PB9" at 62.815,86.363 h0.71; Bottom Overlay "PB8" at 62.815,88.903 h0.71; Bottom Overlay "PC9" at 62.815,91.443 h0.71; Bottom Overlay "PC7" at 62.815,68.583 h0.71; Bottom Overlay "PB6" at 62.815,71.123 h0.71; Bottom Overlay "PA7" at 62.815,73.663 h0.71; Bottom Overlay "PA6" at 62.815,76.203 h0.71; Bottom Overlay "PA5" at 62.815,78.743 h0.71; Bottom Overlay "PB5" at 62.815,55.883 h0.71; Bottom Overlay "PB4" at 62.815,58.423 h0.71; Bottom Overlay "PB10" at 62.815,60.963 h0.71; Bottom Overlay "PA8" at 62.815,63.503 h0.71; Bottom Overlay "PA9" at 62.815,66.043 h0.71; Bottom Overlay "GND" at 62.815,43.183 h0.71; Bottom Overlay "PA3" at 62.815,45.723 h0.71; Bottom Overlay "PA2" at 62.815,48.263 h0.71; Bottom Overlay "PA10" at 62.815,50.803 h0.71; Bottom Overlay "PB3" at 62.815,53.343 h0.71; Bottom Overlay "PE12" at 62.815,30.483 h0.71; Bottom Overlay "PE10" at 62.815,33.023 h0.71; Bottom Overlay "PD11" at 62.815,35.563 h0.71; Bottom Overlay "PD12" at 62.815,38.103 h0.71; Bottom Overlay "PD13" at 62.815,40.643 h0.71; Bottom Overlay "PF12" at 62.815,17.783 h0.71; Bottom Overlay "PF13" at 62.815,20.323 h0.71; Bottom Overlay "PE13" at 62.815,22.863 h0.71; Bottom Overlay "PE15" at 62.815,25.403 h0.71; Bottom Overlay "PE14" at 62.815,27.943 h0.71; Bottom Overlay "PG14" at 62.815,15.243 h0.71; Bottom Overlay "GND" at 62.815,12.703 h0.71; Bottom Overlay "PD10" at 62.815,10.163 h0.71; Bottom Overlay "PG7" at 62.815,7.623 h0.71; Bottom Overlay "PG4" at 62.815,5.083 h0.71; Bottom Overlay "PF14" at 69.572,31.296 h0.71 r45; Bottom Overlay "PF15" at 69.673,18.621 h0.71 r45; Bottom Overlay "PF11" at 69.496,16.005 h0.71 r45; Bottom Overlay "PE0" at 69.521,13.973 h0.71 r45; Bottom Overlay "PG8" at 69.47,11.484 h0.71 r45; Bottom Overlay "PG5" at 69.623,8.791 h0.71 r45; Bottom Overlay "PG6" at 69.597,6.429 h0.71 r45; Bottom Overlay "PD15" at 69.521,33.81 h0.71 r45; Bottom Overlay "PE9" at 69.521,29.264 h0.71 r45; Bottom Overlay "GND" at 69.521,26.749 h0.71 r45; Bottom Overlay "PE11" at 69.648,23.879 h0.71 r45; Bottom Overlay "PF3" at 69.597,21.491 h0.71 r45; Bottom Overlay "PB15" at 69.445,61.674 h0.71 r45; Bottom Overlay "PF5" at 69.572,49.609 h0.71 r45; Bottom Overlay "PF4" at 69.521,47.018 h0.71 r45; Bottom Overlay "PE8" at 69.47,44.554 h0.71 r45; Bottom Overlay "PF10" at 69.724,41.633 h0.71 r45; Bottom Overlay "PE7" at 69.521,39.195 h0.71 r45; Bottom Overlay "PD14" at 69.673,36.477 h0.71 r45; Bottom Overlay "PB1" at 69.343,64.747 h0.71 r45; Bottom Overlay "PB14" at 69.496,59.058 h0.71 r45; Bottom Overlay "PB13" at 69.648,56.645 h0.71 r45; Bottom Overlay "AGND" at 69.714,54.308 h0.71 r45; Bottom Overlay "PC4" at 69.47,51.997 h0.71 r45; Bottom Overlay "PB2" at 69.496,67.44 h0.71 r45; Bottom Overlay "GND" at 69.623,69.827 h0.71 r45; Bottom Overlay "PB11" at 69.496,71.682 h0.71 r45; Bottom Overlay "PB12" at 69.445,74.196 h0.71 r45; Bottom Overlay "PA11" at 69.343,76.711 h0.71 r45; Bottom Overlay "PD8" at 69.521,82.604 h0.71 r45; Bottom Overlay "U5V" at 69.521,85.067 h0.71 r45; Bottom Overlay "PC5" at 69.623,87.734 h0.71 r45; Bottom Overlay "PC6" at 69.597,90.376 h0.71 r45; Bottom Overlay "PC8" at 69.445,92.814 h0.71 r45; Bottom Overlay "OSCI" at 1.932,54.943 h0.71 r315; Bottom Overlay "PH1" at 1.525,27.689 h0.71 r315; Bottom Overlay "PH0" at 1.525,24.641 h0.71 r315